# Altium PCB OFP_CIM_v1.5.PcbDoc (part 3 of 3)
Units mil, origin at the board's own origin, x right, y up, seen from the top; angles counter-clockwise.
Board outline 4311.02 x 2539.37 mil, 4 copper layers (Top Layer, Layer 1, Layer 2, Bottom Layer), stack 62.047 mil thick; 193 components, 140 nets, 567 pads, 380 vias.
Unrouted connection lines stored in the file: 1.
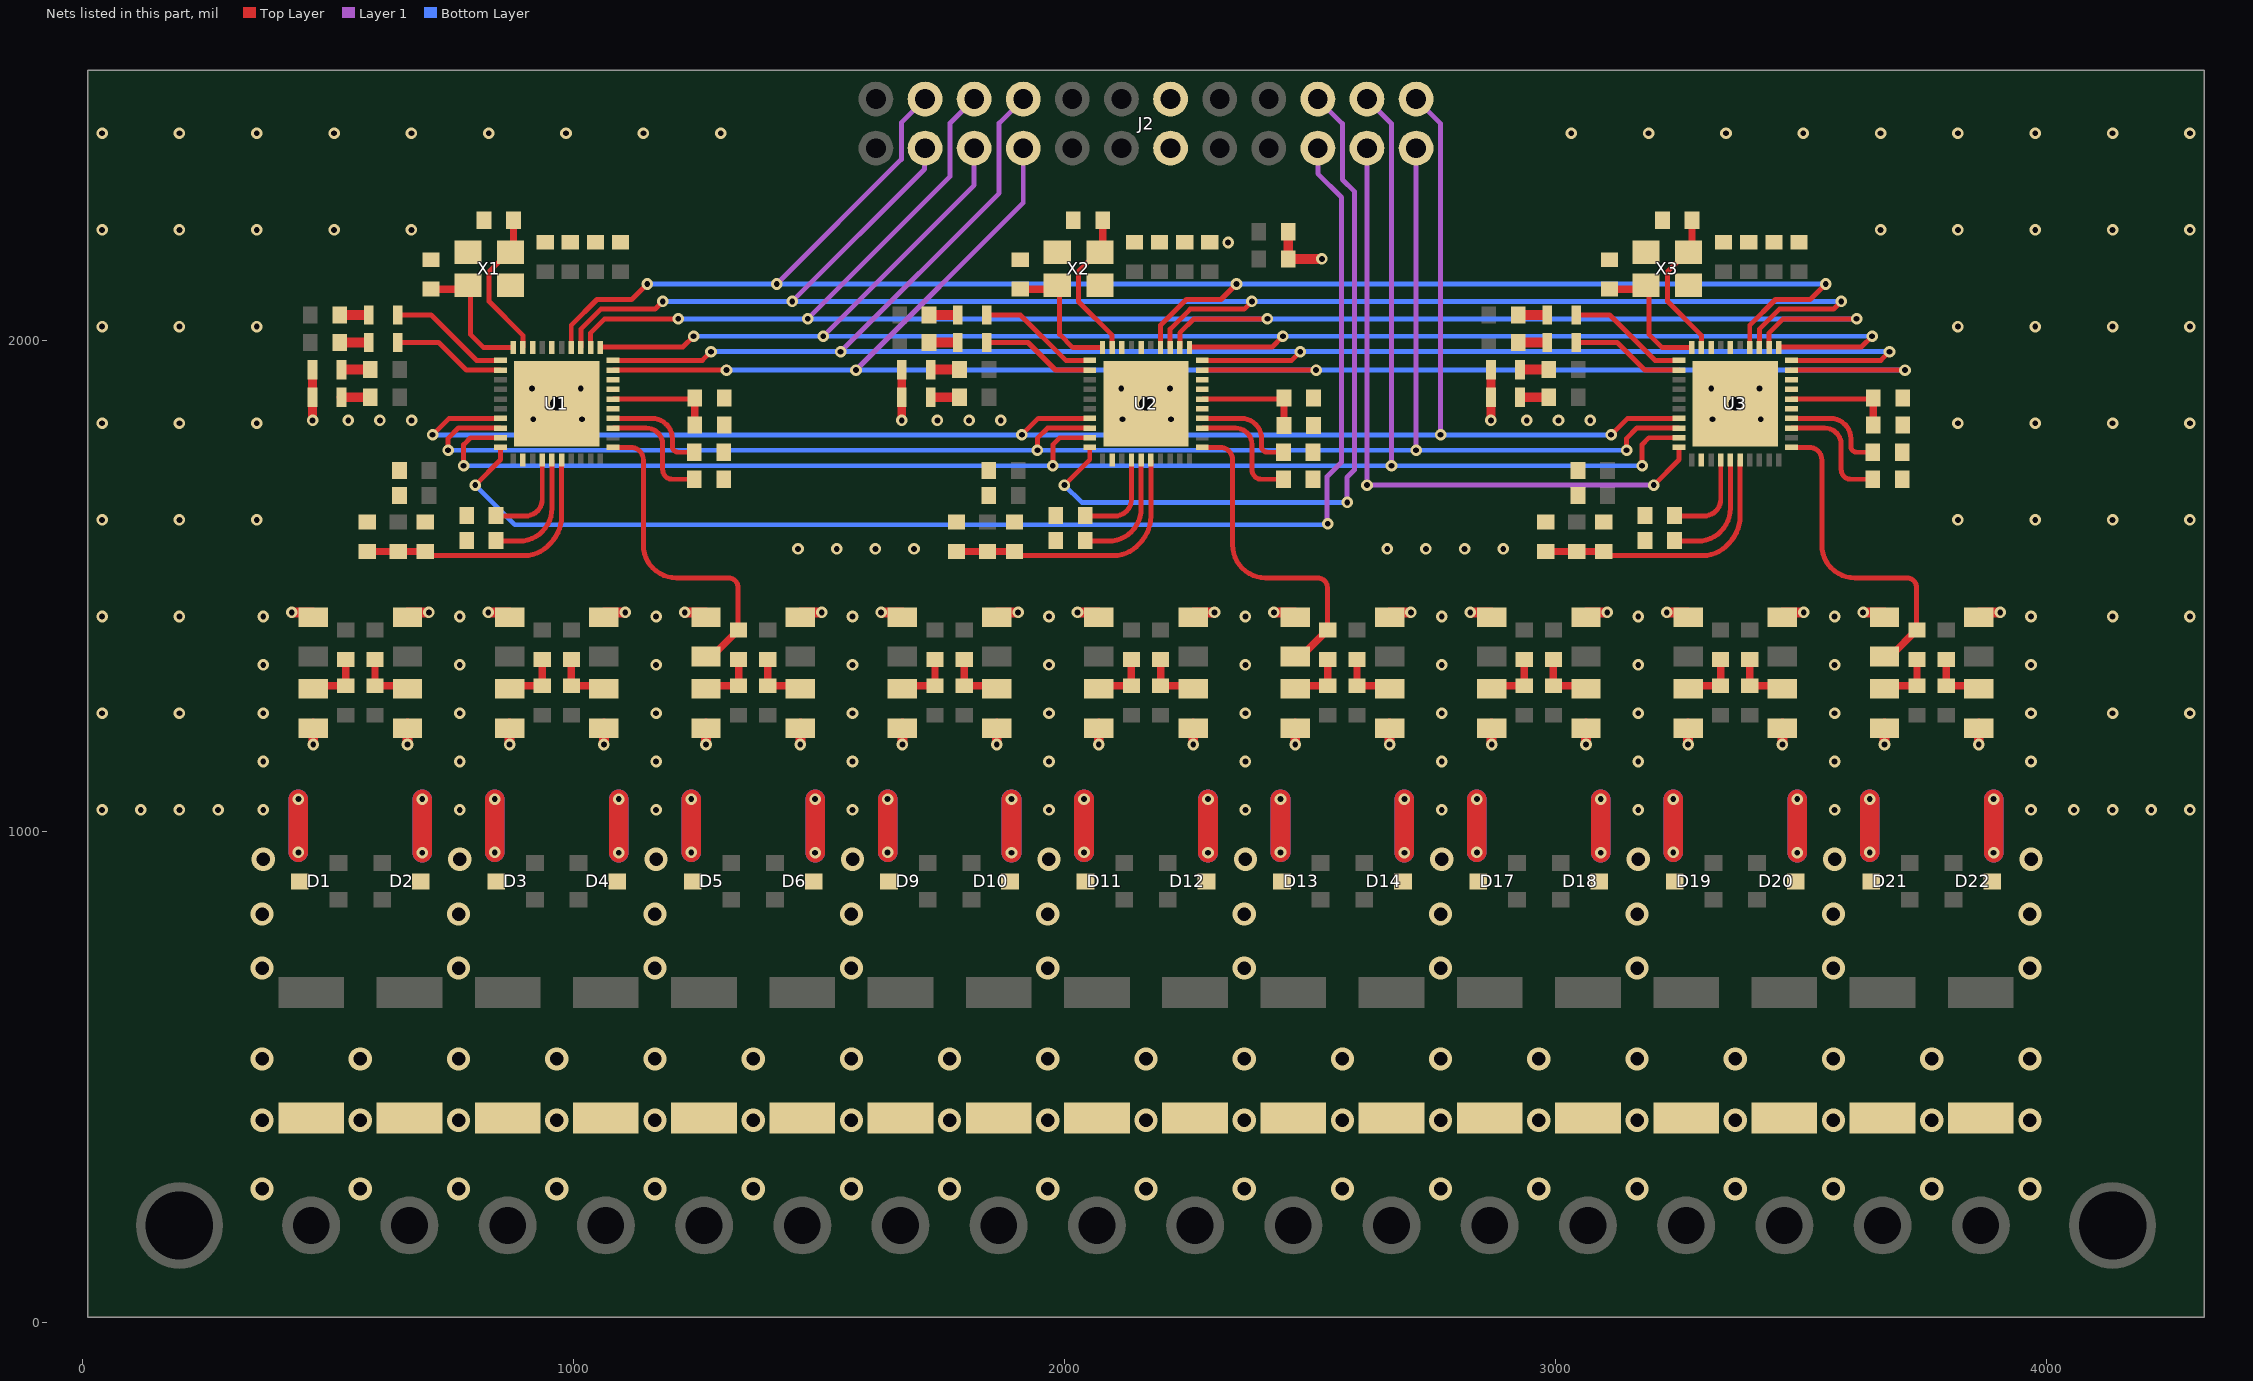
[diagram p4: the nets of this part, all layers, seen from the top]

## Via types
v1: diameter 23.62, hole 11.81, Top Layer to Bottom Layer, tented both sides, 272 vias
v2: diameter 47.24, hole 27.56, Top Layer to Bottom Layer, tented both sides, 108 vias

## Nets (pads, with @x,y where several pads share a name; then routed paths per layer and width w, separated by ;. In a path a pad name is that pad's centre, name@x,y a point inside that pad or via, vN(x,y) a via of type N, cw(c..) or ccw(c..) an arc to the next point about the centre after c; other vN are vias at no path point) (continued)
ICP1: C12.2 R16.2 U1.11 | length 678.2
  Top Layer w10: U1.11@1081.3,1781.5 1116.14,1781.5 cw(c1116.14,1755.91) 1141.73,1755.91 1141.73,1582.68 ccw(c1208.66,1582.68) 1208.66,1515.75 1314.96,1515.75 cw(c1314.96,1496.06) 1334.65,1496.06 R16.2@1334.65,1409.51 ; R16.2@1324.88,1402.64 R16.2@1335.63,1413.39
  Top Layer w15: C12.2@1269.29,1355.51 1291.79,1366.43 1327.2,1402.01 R16.2@1334.67,1409.51
ICP2: C39.2 R49.2 U2.11 | length 663
  Top Layer w10: U2.11@2281.3,1781.5 2316.14,1781.5 cw(c2316.14,1755.91) 2341.73,1755.91 2341.73,1582.68 ccw(c2408.66,1582.68) 2408.66,1515.75 2514.96,1515.75 cw(c2514.96,1496.06) 2534.65,1496.06 R49.2@2534.65,1409.51
  Top Layer w15: C39.2@2469.29,1355.51 2491.79,1366.43 2527.2,1402.01 R49.2@2534.67,1409.51
ICP3: C66.2 R82.2 U3.11 | length 663
  Top Layer w10: U3.11@3481.3,1781.5 3516.14,1781.5 cw(c3516.14,1755.91) 3541.73,1755.91 3541.73,1582.68 ccw(c3608.66,1582.68) 3608.66,1515.75 3714.96,1515.75 cw(c3714.96,1496.06) 3734.65,1496.06 R82.2@3734.65,1409.51
  Top Layer w15: C66.2@3669.29,1355.51 3691.79,1366.43 3727.2,1402.01 R82.2@3734.67,1409.51
IN_N1: 
IN_N2: 
IN_N3: 
IN_P1: 
IN_P2: 
IN_P3: 
INN1: R27.1 U1.14 | length 213.6
  Top Layer w10: U1.14@1081.3,1840.55 1159.45,1840.55 cw(c1159.45,1799.21) 1200.79,1799.21 1200.79,1783.47 ccw(c1212.6,1783.47) 1212.6,1771.65 R27.1@1245.38,1771.65 R27.1@1248.82,1771.65
INN2: R60.1 U2.14 | length 213.6
  Top Layer w10: U2.14@2281.3,1840.55 2359.45,1840.55 cw(c2359.45,1799.21) 2400.79,1799.21 2400.79,1783.47 ccw(c2412.6,1783.47) 2412.6,1771.65 R60.1@2445.38,1771.65 R60.1@2448.82,1771.65
INN3: R93.1 U3.14 | length 213.6
  Top Layer w10: U3.14@3481.3,1840.55 3559.45,1840.55 cw(c3559.45,1799.21) 3600.79,1799.21 3600.79,1783.47 ccw(c3612.6,1783.47) 3612.6,1771.65 R93.1@3645.38,1771.65 R93.1@3648.82,1771.65
INP1: R25.2 U1.13 | length 249
  Top Layer w10: U1.13@1081.3,1820.87 1147.64,1820.87 cw(c1147.64,1787.4) 1181.1,1787.4 1181.1,1736.22 ccw(c1200.79,1736.22) 1200.79,1716.54 R25.2@1248.82,1716.54
INP2: R58.2 U2.13 | length 249
  Top Layer w10: U2.13@2281.3,1820.87 2347.64,1820.87 cw(c2347.64,1787.4) 2381.1,1787.4 2381.1,1736.22 ccw(c2400.79,1736.22) 2400.79,1716.54 R58.2@2448.82,1716.54
INP3: R91.2 U3.13 | length 249
  Top Layer w10: U3.13@3481.3,1820.87 3547.64,1820.87 cw(c3547.64,1787.4) 3581.1,1787.4 3581.1,1736.22 ccw(c3600.79,1736.22) 3600.79,1716.54 R91.2@3648.82,1716.54
IRQ0_1: LED3.2 U1.31 | length 246.5
  Top Layer w10: LED3.2@641.24,2051.18 709.45,2051.18 801.97,1958.66 U1.31@849.41,1958.66
IRQ0_2: LED7.2 U2.31 | length 246.5
  Top Layer w10: LED7.2@1841.24,2051.18 1909.45,2051.18 2001.97,1958.66 U2.31@2049.41,1958.66
IRQ0_3: LED11.2 U3.31 | length 246.5
  Top Layer w10: LED11.2@3041.24,2051.18 3109.45,2051.18 3201.97,1958.66 U3.31@3249.41,1958.66
IRQ1_1: LED4.2 U1.32 | length 231.4
  Top Layer w10: LED4.2@641.24,1995 725.04,1995 781.06,1938.98 U1.32@849.41,1938.98
IRQ1_2: LED8.2 U2.32 | length 231.4
  Top Layer w10: LED8.2@1841.24,1995 1925.04,1995 1981.06,1938.98 U2.32@2049.41,1938.98
IRQ1_3: LED12.2 U3.32 | length 231.4
  Top Layer w10: LED12.2@3041.24,1995 3125.04,1995 3181.06,1938.98 U3.32@3249.41,1938.98
MISO: J2.2 U1.38 U2.38 U3.38 | length 3430.2
  Top Layer w10: v1(744.09,1775.59) 744.09,1799.85 765.11,1820.87 U1.38@849.41,1820.87 ; v1(1944.09,1775.59) 1944.09,1799.85 1965.11,1820.87 U2.38@2049.41,1820.87 ; v1(3144.09,1775.59) 3144.09,1799.85 3165.11,1820.87 U3.38@3249.41,1820.87
  Layer 1 w10: v1(2715.35,1775.59) J2.2@2715.35,2390.95
  Bottom Layer w10: v1(744.09,1775.59) v1(1944.09,1775.59) v1(2715.35,1775.59) v1(3144.09,1775.59)
MOSI: J2.3 U1.39 U2.39 U3.39 | length 3535.7
  Top Layer w10: v1(775.59,1744.1) 775.59,1787.2 789.57,1801.18 U1.39@849.41,1801.18 ; v1(1975.59,1744.1) 1975.59,1787.2 1989.57,1801.18 U2.39@2049.41,1801.18 ; v1(3175.59,1744.1) 3175.59,1787.2 3189.57,1801.18 U3.39@3249.41,1801.18
  Layer 1 w10: J2.3@2615.35,2490.95 2665.35,2440.95 v1(2665.35,1744.1)
  Bottom Layer w10: v1(775.59,1744.1) v1(1975.59,1744.1) v1(3175.59,1744.1)
NetC1_2: C1.2 R1.2 R2.1 | length 122.5
  Top Layer w15: C1.2@469.29,1289.84 475.29,1295.84 R1.2@535.63,1295.84 R2.1@535.63,1349.51
NetC3_1: C3.1 R5.2 R6.1 | length 114
  Top Layer w15: R6.1@595.08,1349.51 R5.2@595.08,1295.84 C3.1@655.42,1295.84
NetC5_2: C5.2 R9.2 R10.1 | length 122.5
  Top Layer w15: C5.2@869.29,1289.84 875.29,1295.84 R9.2@935.63,1295.84 R10.1@935.63,1349.51
NetC7_1: C7.1 R13.2 R14.1 | length 114
  Top Layer w15: R14.1@995.08,1349.51 R13.2@995.08,1295.84 C7.1@1055.42,1295.84
NetC9_2: C9.2 U1.30 X1.3 | length 279.2
  Top Layer w10: X1.3@775.91,2103.86 X1.3@783.86,2111.81 ; X1.3@784.65,2112.6 789.51,2107.73 789.51,2011.59 816.56,1984.55 U1.30@876.77,1984.55
  Top Layer w15: C9.2@709.45,2103.86 X1.3@775.91,2103.86
NetC10_2: C10.2 U1.29 X1.1 | length 309.4
  Top Layer w10: X1.1@870.47,2178.74 X1.1@877.36,2185.63 ; X1.1@870.59,2178.62 866.65,2178.62 827.68,2139.65 827.68,2078.62 896.46,2009.84 896.46,1986.02 U1.29@896.57,1985.91
  Top Layer w15: X1.1@877.36,2185.63 C10.2@877.36,2243.98
NetC11_2: C11.2 R15.2 R16.1 | length 122.5
  Top Layer w15: C11.2@1269.29,1289.84 1275.29,1295.84 R15.2@1335.63,1295.84 R16.1@1335.63,1349.51
NetC13_1: C13.1 R19.2 R20.1 | length 114
  Top Layer w15: R20.1@1395.08,1349.51 R19.2@1395.08,1295.84 C13.1@1455.42,1295.84
NetC16_2: 
NetC18_1: 
NetC28_2: C28.2 R34.2 R35.1 | length 122.5
  Top Layer w15: C28.2@1669.29,1289.84 1675.29,1295.84 R34.2@1735.63,1295.84 R35.1@1735.63,1349.51
NetC30_1: C30.1 R38.2 R39.1 | length 114
  Top Layer w15: R39.1@1795.08,1349.51 R38.2@1795.08,1295.84 C30.1@1855.42,1295.84
NetC32_2: C32.2 R42.2 R43.1 | length 122.5
  Top Layer w15: C32.2@2069.29,1289.84 2075.29,1295.84 R42.2@2135.63,1295.84 R43.1@2135.63,1349.51
NetC34_1: C34.1 R46.2 R47.1 | length 114
  Top Layer w15: R47.1@2195.08,1349.51 R46.2@2195.08,1295.84 C34.1@2255.42,1295.84
NetC36_2: C36.2 U2.30 X2.3 | length 279.2
  Top Layer w10: X2.3@1975.91,2103.86 X2.3@1983.86,2111.81 ; X2.3@1984.65,2112.6 1989.51,2107.73 1989.51,2011.59 2016.56,1984.55 U2.30@2076.77,1984.55
  Top Layer w15: C36.2@1909.45,2103.86 X2.3@1975.91,2103.86
NetC37_2: C37.2 U2.29 X2.1 | length 309.4
  Top Layer w10: X2.1@2070.47,2178.74 X2.1@2077.36,2185.63 ; X2.1@2070.59,2178.62 2066.65,2178.62 2027.68,2139.65 2027.68,2078.62 2096.46,2009.84 2096.46,1986.02 U2.29@2096.57,1985.91
  Top Layer w15: X2.1@2077.36,2185.63 C37.2@2077.36,2243.98
NetC38_2: C38.2 R48.2 R49.1 | length 122.5
  Top Layer w15: C38.2@2469.29,1289.84 2475.29,1295.84 R48.2@2535.63,1295.84 R49.1@2535.63,1349.51
NetC40_1: C40.1 R52.2 R53.1 | length 114
  Top Layer w15: R53.1@2595.08,1349.51 R52.2@2595.08,1295.84 C40.1@2655.42,1295.84
NetC43_2: 
NetC45_1: 
NetC55_2: C55.2 R67.2 R68.1 | length 122.5
  Top Layer w15: C55.2@2869.29,1289.84 2875.29,1295.84 R67.2@2935.63,1295.84 R68.1@2935.63,1349.51
NetC57_1: C57.1 R71.2 R72.1 | length 114
  Top Layer w15: R72.1@2995.08,1349.51 R71.2@2995.08,1295.84 C57.1@3055.42,1295.84
NetC59_2: C59.2 R75.2 R76.1 | length 122.5
  Top Layer w15: C59.2@3269.29,1289.84 3275.29,1295.84 R75.2@3335.63,1295.84 R76.1@3335.63,1349.51
NetC61_1: C61.1 R79.2 R80.1 | length 114
  Top Layer w15: R80.1@3395.08,1349.51 R79.2@3395.08,1295.84 C61.1@3455.42,1295.84
NetC63_2: C63.2 U3.30 X3.3 | length 279.2
  Top Layer w10: X3.3@3175.91,2103.86 X3.3@3183.86,2111.81 ; X3.3@3184.65,2112.6 3189.51,2107.73 3189.51,2011.59 3216.56,1984.55 U3.30@3276.77,1984.55
  Top Layer w15: C63.2@3109.45,2103.86 X3.3@3175.91,2103.86
NetC64_2: C64.2 U3.29 X3.1 | length 309.4
  Top Layer w10: X3.1@3270.47,2178.74 X3.1@3277.36,2185.63 ; X3.1@3270.59,2178.62 3266.65,2178.62 3227.68,2139.65 3227.68,2078.62 3296.46,2009.84 3296.46,1986.02 U3.29@3296.57,1985.91
  Top Layer w15: X3.1@3277.36,2185.63 C64.2@3277.36,2243.98
NetC65_2: C65.2 R81.2 R82.1 | length 122.5
  Top Layer w15: C65.2@3669.29,1289.84 3675.29,1295.84 R81.2@3735.63,1295.84 R82.1@3735.63,1349.51
NetC67_1: C67.1 R85.2 R86.1 | length 114
  Top Layer w15: R86.1@3795.08,1349.51 R85.2@3795.08,1295.84 C67.1@3855.42,1295.84
NetC70_2: 
NetC72_1: 
NetD7_1: 
NetD8_1: 
NetD15_1: 
NetD16_1: 
NetD23_1: 
NetD24_1: 
NetLED1_1: LED1.1 R30.1 | length 53.5
  Top Layer w20: LED1.1@528.72,1939.88 R30.1@582.24,1939.88
NetLED2_1: LED2.1 R31.1 | length 58.6
  Top Layer w20: LED2.1@527.13,1883.7 R31.1@585.71,1883.7
NetLED3_1: LED3.1 R32.1 | length 56.7
  Top Layer w20: R32.1@523.6,2051.18 LED3.1@580.32,2051.18
NetLED4_1: LED4.1 R33.1 | length 56.4
  Top Layer w20: R33.1@523.6,1995 LED4.1@580.04,1995
NetLED5_1: LED5.1 R63.1 | length 53.5
  Top Layer w20: LED5.1@1728.72,1939.88 R63.1@1782.24,1939.88
NetLED6_1: LED6.1 R64.1 | length 58.6
  Top Layer w20: LED6.1@1727.13,1883.7 R64.1@1785.71,1883.7
NetLED7_1: LED7.1 R65.1 | length 56.7
  Top Layer w20: R65.1@1723.6,2051.18 LED7.1@1780.32,2051.18
NetLED8_1: LED8.1 R66.1 | length 56.4
  Top Layer w20: R66.1@1723.6,1995 LED8.1@1780.04,1995
NetLED9_1: LED9.1 R96.1 | length 53.5
  Top Layer w20: LED9.1@2928.72,1939.88 R96.1@2982.24,1939.88
NetLED10_1: LED10.1 R97.1 | length 58.6
  Top Layer w20: LED10.1@2927.13,1883.7 R97.1@2985.71,1883.7
NetLED11_1: LED11.1 R98.1 | length 56.7
  Top Layer w20: R98.1@2923.6,2051.18 LED11.1@2980.32,2051.18
NetLED12_1: LED12.1 R99.1 | length 56.4
  Top Layer w20: R99.1@2923.6,1995 LED12.1@2980.04,1995
NetR7_2: R7.2 U1.4 | length 194.2
  Top Layer w10: R7.2@839.37,1641.73 901.57,1641.73 ccw(c901.57,1675.98) 935.83,1675.98 U1.4@935.83,1754.13
NetR8_2: R8.2 U1.5 | length 251
  Top Layer w10: R8.2@839.37,1590.55 888.62,1590.55 ccw(c888.62,1657.44) 955.51,1657.44 U1.5@955.51,1754.13
NetR40_2: R40.2 U2.4 | length 194.2
  Top Layer w10: R40.2@2039.37,1641.73 2101.57,1641.73 ccw(c2101.57,1675.98) 2135.83,1675.98 U2.4@2135.83,1754.13
NetR41_2: R41.2 U2.5 | length 251
  Top Layer w10: R41.2@2039.37,1590.55 2088.62,1590.55 ccw(c2088.62,1657.44) 2155.51,1657.44 U2.5@2155.51,1754.13
NetR73_2: R73.2 U3.4 | length 194.2
  Top Layer w10: R73.2@3239.37,1641.73 3301.57,1641.73 ccw(c3301.57,1675.98) 3335.83,1675.98 U3.4@3335.83,1754.13
NetR74_2: R74.2 U3.5 | length 251
  Top Layer w10: R74.2@3239.37,1590.55 3288.62,1590.55 ccw(c3288.62,1657.44) 3355.51,1657.44 U3.5@3355.51,1754.13
NGND: C1.1 C2.1 C3.2 C4.2 C5.1 C6.1 C7.2 C8.2 C9.1 C10.1 C11.1 C12.1 C13.2 C14.2 C15.1 C20.1 C21.1 C22.1 C23.1 C24.1 C25.1 C26.1 C27.1 C28.1 C29.1 C30.2 C31.2 C32.1 C33.1 C34.2 C35.2 C36.1 C37.1 C38.1 C39.1 C40.2 C41.2 C42.1 C47.1 C48.1 C49.1 C50.1 C51.1 C52.1 C53.1 C54.1 C55.1 C56.1 C57.2 C58.2 C59.1 C60.1 C61.2 C62.2 C63.1 C64.1 C65.1 C66.1 C67.2 C68.2 C69.1 C74.1 C75.1 C76.1 C77.1 C78.1 C79.1 C80.1 C81.1 C82.1 C83.1 D1.3 D2.3 D3.3 D4.3 D5.3 D6.3 D9.3 D10.3 D11.3 D12.3 D13.3 D14.3 D17.3 D18.3 D19.3 D20.3 D21.3 D22.3 J2.11 J2.12 LED1.2 LED2.2 LED5.2 LED6.2 LED9.2 LED10.2 R3.1 R4.2 R7.1 R8.1 R11.1 R12.2 R17.1 R18.2 R25.1 R27.2 R36.1 R37.2 R40.1 R41.1 R44.1 R45.2 R50.1 R51.2 R58.1 R60.2 R69.1 R70.2 R73.1 R74.1 R77.1 R78.2 R83.1 R84.2 R91.1 R93.2 SB1.1 SB2.1 SB3.1 U1.2 U1.15 U1.17 U1.18 U1.26 U1.28 U1.41 U2.2 U2.15 U2.17 U2.18 U2.26 U2.28 U2.41 U3.2 U3.15 U3.17 U3.18 U3.26 U3.28 U3.41 X1.2 X1.4 X2.2 X2.4 X3.2 X3.4 | length 5880.7
  Top Layer w18: LED2.2@467.82,1883.7 467.82,1924.03 467.91,1924.12 LED1.2@467.91,1930.2 ; v1@468.07,1836.7 LED2.2@468.07,1883.7 ; LED6.2@1667.82,1883.7 1667.82,1924.03 1667.91,1924.12 LED5.2@1667.91,1930.2 ; v1@1668.07,1836.7 LED6.2@1668.07,1883.7 ; LED10.2@2867.82,1883.7 2867.82,1924.03 2867.91,1924.12 LED9.2@2867.91,1930.2 ; v1@2868.07,1836.7 LED10.2@2868.07,1883.7
  Top Layer w20: v1(425.83,1445.51) C2.1@469.29,1445.51 ; v1(469.29,1176.38) C1.1@469.29,1219.84 ; v1(661.42,1176.38) C3.2@661.42,1219.84 ; C4.2@661.42,1445.51 v1(704.88,1445.51) ; v1(825.83,1445.51) C6.1@869.29,1445.51 ; v1(869.29,1176.38) C5.1@869.29,1219.84 ; v1(1061.42,1176.38) C7.2@1061.42,1219.84 ; C8.2@1061.42,1445.51 v1(1104.88,1445.51) ; v1(1225.83,1445.51) C12.1@1269.29,1445.51 ; v1(1269.29,1176.38) C11.1@1269.29,1219.84 ; v1(1461.42,1176.38) C13.2@1461.42,1219.84 ; C14.2@1461.42,1445.51 v1(1504.88,1445.51) ; v1(1625.83,1445.51) C29.1@1669.29,1445.51 ; v1(1669.29,1176.38) C28.1@1669.29,1219.84 ; v1(1861.42,1176.38) C30.2@1861.42,1219.84 ; C31.2@1861.42,1445.51 v1(1904.88,1445.51) ; v1(2025.83,1445.51) C33.1@2069.29,1445.51 ; v1(2069.29,1176.38) C32.1@2069.29,1219.84 ; v1(2261.42,1176.38) C34.2@2261.42,1219.84 ; C35.2@2261.42,1445.51 v1(2304.88,1445.51) ; v1(2425.83,1445.51) C39.1@2469.29,1445.51 ; C83.1@2455.2,2220.47 C82.1@2455.2,2165.35 v1(2523.62,2165.35) ; v1(2469.29,1176.38) C38.1@2469.29,1219.84 ; v1(2661.42,1176.38) C40.2@2661.42,1219.84 ; C41.2@2661.42,1445.51 v1(2704.88,1445.51) ; v1(2825.83,1445.51) C56.1@2869.29,1445.51 ; v1(2869.29,1176.38) C55.1@2869.29,1219.84 ; v1(3061.42,1176.38) C57.2@3061.42,1219.84 ; C58.2@3061.42,1445.51 v1(3104.88,1445.51) ; v1(3225.83,1445.51) C60.1@3269.29,1445.51 ; v1(3269.29,1176.38) C59.1@3269.29,1219.84 ; v1(3461.42,1176.38) C61.2@3461.42,1219.84 ; C62.2@3461.42,1445.51 v1(3504.88,1445.51) ; v1(3625.83,1445.51) C66.1@3669.29,1445.51 ; v1(3669.29,1176.38) C65.1@3669.29,1219.84 ; v1(3861.42,1176.38) C67.2@3861.42,1219.84 ; C68.2@3861.42,1445.51 v1(3904.88,1445.51)
  Top Layer w40: v1(439.17,956.69) v1(439.17,1065.16) ; v1(691.54,955.91) v1@691.54,1064.37 ; v1(839.17,956.69) v1(839.17,1065.16) ; v1(1091.54,955.91) v1@1091.54,1064.37 ; v1(1239.17,956.69) v1(1239.17,1065.16) ; v1(1491.54,955.91) v1@1491.54,1064.37 ; v1(1639.17,956.69) v1(1639.17,1065.16) ; v1(1891.54,955.91) v1@1891.54,1064.37 ; v1(2039.17,956.69) v1(2039.17,1065.16) ; v1(2291.54,955.91) v1@2291.54,1064.37 ; v1(2439.17,956.69) v1(2439.17,1065.16) ; v1(2691.54,955.91) v1@2691.54,1064.37 ; v1(2839.17,956.69) v1(2839.17,1065.16) ; v1(3091.54,955.91) v1@3091.54,1064.37 ; v1(3239.17,956.69) v1(3239.17,1065.16) ; v1(3491.54,955.91) v1@3491.54,1064.37 ; v1(3639.17,956.69) v1(3639.17,1065.16) ; v1(3891.54,955.91) v1@3891.54,1064.37
  Bottom Layer w40: v1(439.17,956.69) v1(439.17,1065.16) ; v1(691.54,955.91) v1(691.54,1065.16) ; v1(839.17,956.69) v1(839.17,1065.16) ; v1(1091.54,955.91) v1(1091.54,1065.16) ; v1(1239.17,956.69) v1(1239.17,1065.16) ; v1(1491.54,955.91) v1(1491.54,1065.16) ; v1(1639.17,956.69) v1(1639.17,1065.16) ; v1(1891.54,955.91) v1(1891.54,1065.16) ; v1(2039.17,956.69) v1(2039.17,1065.16) ; v1(2291.54,955.91) v1(2291.54,1065.16) ; v1(2439.17,956.69) v1(2439.17,1065.16) ; v1(2691.54,955.91) v1(2691.54,1065.16) ; v1(2839.17,956.69) v1(2839.17,1065.16) ; v1(3091.54,955.91) v1(3091.54,1065.16) ; v1(3239.17,956.69) v1(3239.17,1065.16) ; v1(3491.54,955.91) v1(3491.54,1065.16) ; v1(3639.17,956.69) v1(3639.17,1065.16) ; v1(3891.54,955.91) v1(3891.54,1065.16)
  other v1: 39.37,1043.31 118.11,1043.31 196.85,1043.31 275.59,1043.31 367.72,1043.31 767.72,1043.31 1167.72,1043.31 1567.72,1043.31 1967.72,1043.31 2367.72,1043.31 2767.72,1043.31 3167.72,1043.31 3567.72,1043.31 3967.72,1043.31 4055.12,1043.31 4133.86,1043.31 4212.6,1043.31 4291.34,1043.31 367.72,1141.73 767.72,1141.73 1167.72,1141.73 1567.72,1141.73 1967.72,1141.73 2367.72,1141.73 2767.72,1141.73 3167.72,1141.73 3567.72,1141.73 3967.72,1141.73 39.37,1240.16 196.85,1240.16 367.72,1240.16 767.72,1240.16 1167.72,1240.16 1567.72,1240.16 1967.72,1240.16 2367.72,1240.16 2767.72,1240.16 3167.72,1240.16 3567.72,1240.16 3967.72,1240.16 4133.86,1240.16 4291.34,1240.16 367.72,1338.58 767.72,1338.58 1167.72,1338.58 1567.72,1338.58 1967.72,1338.58 2367.72,1338.58 2767.72,1338.58 3167.72,1338.58 3567.72,1338.58 3967.72,1338.58 39.37,1437.01 196.85,1437.01 367.72,1437.01 767.72,1437.01 1167.72,1437.01 1567.72,1437.01 1967.72,1437.01 2367.72,1437.01 2767.72,1437.01 3167.72,1437.01 3567.72,1437.01 3967.72,1437.01 4133.86,1437.01 4291.34,1437.01 1456.69,1574.8 1535.43,1574.8 1614.17,1574.8 1692.91,1574.8 2656.69,1574.8 2735.43,1574.8 2814.17,1574.8 2892.91,1574.8 39.37,1633.86 196.85,1633.86 354.33,1633.86 3818.9,1633.86 3976.38,1633.86 4133.86,1633.86 4291.34,1633.86 39.37,1830.71 196.85,1830.71 354.33,1830.71 3818.9,1830.71 3976.38,1830.71 4133.86,1830.71 4291.34,1830.71 468.07,1836.46 540.55,1836.46 605.12,1836.46 669.69,1836.46 1668.07,1836.46 1740.55,1836.46 1805.12,1836.46 1869.69,1836.46 2867.82,1836.46 2940.95,1836.46 3005.51,1836.46 3070.08,1836.46 917.32,1838.58 1016.54,1838.58 2117.32,1838.58 2216.54,1838.58 3318.9,1838.58 3417.32,1838.58 914.96,1901.58 1014.17,1901.58 2114.96,1901.58 2214.17,1901.58 3316.54,1901.58 3414.96,1901.58 39.37,2027.56 196.85,2027.56 354.33,2027.56 3818.9,2027.56 3976.38,2027.56 4133.86,2027.56 4291.34,2027.56 2332.63,2198.77 39.37,2224.41 196.85,2224.41 354.33,2224.41 511.81,2224.41 669.29,2224.41 3661.42,2224.41 3818.9,2224.41 3976.38,2224.41 4133.86,2224.41 4291.34,2224.41 39.37,2421.26 196.85,2421.26 354.33,2421.26 511.81,2421.26 669.29,2421.26 826.77,2421.26 984.25,2421.26 1141.73,2421.26 1299.21,2421.26 3031.5,2421.26 3188.98,2421.26 3346.46,2421.26 3503.94,2421.26 3661.42,2421.26 3818.9,2421.26 3976.38,2421.26 4133.86,2421.26 4291.34,2421.26
  other v2: 365.35,271.26 565.35,271.26 765.35,271.26 965.35,271.26 1165.35,271.26 1365.35,271.26 1565.35,271.26 1765.35,271.26 1965.35,271.26 2165.35,271.26 2365.35,271.26 2565.35,271.26 2765.35,271.26 2965.35,271.26 3165.35,271.26 3365.35,271.26 3565.35,271.26 3765.35,271.26 3965.35,271.26 365.35,411.22 565.35,411.22 765.35,411.22 965.35,411.22 1165.35,411.22 1365.35,411.22 1565.35,411.22 1765.35,411.22 1965.35,411.22 2165.35,411.22 2365.35,411.22 2565.35,411.22 2765.35,411.22 2965.35,411.22 3165.35,411.22 3365.35,411.22 3565.35,411.22 3765.35,411.22 3965.35,411.22 365.35,536.18 565.35,536.18 765.35,536.18 965.35,536.18 1165.35,536.18 1365.35,536.18 1565.35,536.18 1765.35,536.18 1965.35,536.18 2165.35,536.18 2365.35,536.18 2565.35,536.18 2765.35,536.18 2965.35,536.18 3165.35,536.18 3365.35,536.18 3565.35,536.18 3765.35,536.18 3965.35,536.18 365.35,721.14 765.35,721.14 1165.35,721.14 1565.35,721.14 1965.35,721.14 2365.35,721.14 2765.35,721.14 3165.35,721.14 3565.35,721.14 3965.35,721.14 365.35,831.1 765.35,831.1 1165.35,831.1 1565.35,831.1 1965.35,831.1 2365.35,831.1 2765.35,831.1 3165.35,831.1 3565.35,831.1 3965.35,831.1 367.72,942.83 767.72,942.83 1167.72,942.83 1567.72,942.83 1967.72,942.83 2367.72,942.83 2767.72,942.83 3167.72,942.83 3567.72,942.83 3967.72,942.83 965.35,1870.08 2165.35,1870.08 3365.35,1870.08
REF1: C24.2 C25.2 U1.16 | length 221.3
  Top Layer w10: U1.16@1081.3,1879.92 1244.41,1879.92 ccw(c1244.41,1881.89) C25.2@1246.38,1881.89
  Top Layer w15: C24.2@1246.38,1826.77 C25.2@1246.38,1881.89
REF2: C51.2 C52.2 U2.16 | length 221.3
  Top Layer w10: U2.16@2281.3,1879.92 2444.41,1879.92 ccw(c2444.41,1881.89) C52.2@2446.38,1881.89
  Top Layer w15: C51.2@2446.38,1826.77 C52.2@2446.38,1881.89
REF3: C78.2 C79.2 U3.16 | length 221.3
  Top Layer w10: U3.16@3481.3,1879.92 3644.41,1879.92 ccw(c3644.41,1881.89) C79.2@3646.38,1881.89
  Top Layer w15: C78.2@3646.38,1826.77 C79.2@3646.38,1881.89
RESET1: C15.2 R21.2 SB1.2 U1.6 | length 554.5
  Top Layer w10: C15.2@697.64,1569.55 706.12,1561.07 899.17,1561.07 ccw(c899.17,1629.96) 952.45,1586.29 ccw(c897.55,1641.19) 975.2,1641.19 U1.6@975.2,1754.13
  Top Layer w15: SB1.2@583.03,1569.55 R21.2@642.52,1569.55 C15.2@697.64,1569.55
RESET2: C42.2 R54.2 SB2.2 U2.6 | length 554.5
  Top Layer w10: C42.2@1897.64,1569.55 1906.12,1561.07 2099.17,1561.07 ccw(c2099.17,1629.96) 2152.45,1586.29 ccw(c2097.55,1641.19) 2175.2,1641.19 U2.6@2175.2,1754.13
  Top Layer w15: SB2.2@1783.03,1569.55 R54.2@1842.52,1569.55 C42.2@1897.64,1569.55
RESET3: C69.2 R87.2 SB3.2 U3.6 | length 554.5
  Top Layer w10: C69.2@3097.64,1569.55 3106.12,1561.07 3299.17,1561.07 ccw(c3299.17,1629.96) 3352.45,1586.29 ccw(c3297.55,1641.19) 3375.2,1641.19 U3.6@3375.2,1754.13
  Top Layer w15: SB3.2@2983.03,1569.55 R87.2@3042.52,1569.55 C69.2@3097.64,1569.55
SCLK: J2.1 U1.37 U2.37 U3.37 | length 3556.6
  Top Layer w10: v1(712.6,1807.09) 746.06,1840.55 U1.37@849.41,1840.55 ; v1(1912.6,1807.09) 1946.06,1840.55 U2.37@2049.41,1840.55 ; v1(3112.6,1807.09) 3146.06,1840.55 U3.37@3249.41,1840.55
  Layer 1 w10: J2.1@2715.35,2490.95 2765.35,2440.95 v1(2765.35,1807.09)
  Bottom Layer w10: v1(712.6,1807.09) v1(1912.6,1807.09) 2803.15,1807.09 v1(3112.6,1807.09)
SS1: J2.6 U1.40 | length 2666.3
  Top Layer w10: v1(799.21,1704.72) 850.88,1756.4 U1.40@850.88,1781.5
  Layer 1 w10: J2.6@2515.35,2390.95 2515.35,2338.8 2563.49,2290.66 2563.49,1751.51 2534.25,1722.27 2534.25,1627.17 v1(2535.43,1625.98)
  Bottom Layer w10: v1(799.21,1704.72) 880.08,1623.86 2533.31,1623.86 v1(2535.43,1625.98)
SS2: J2.5 U2.40 | length 1547.3
  Top Layer w10: v1(1999.21,1704.72) 2050.88,1756.4 U2.40@2050.88,1781.5
  Layer 1 w10: J2.5@2515.35,2490.95 2565.35,2440.95 2565.35,2327.07 2589.69,2302.73 2589.69,1735.36 2574.8,1720.47 2574.8,1669.76 v1(2575.12,1669.45)
  Bottom Layer w10: v1(1999.21,1704.72) 2034.49,1669.45 v1(2575.12,1669.45)
SS3: J2.4 U3.40 | length 1360.4
  Top Layer w10: v1(3199.21,1704.72) 3250.88,1756.4 U3.40@3250.88,1781.5
  Layer 1 w10: v1(2615.35,1704.72) v1(3199.21,1704.72) ; v1@2615.35,1712.6 J2.4@2615.35,2390.95
VA_N: J2.18 U1.19 U2.19 U3.19 | length 3690.4
  Top Layer w10: U1.19@1081.3,1938.98 1305.12,1938.98 ccw(c1305.12,1944.88) v1@1311.02,1944.88 ; U2.19@2281.3,1938.98 2505.12,1938.98 ccw(c2505.12,1944.88) v1@2511.02,1944.88 ; U3.19@3479.82,1938.98 v1(3711.02,1938.98)
  Layer 1 w10: v1(1574.8,1938.98) 1915.35,2279.53 J2.18@1915.35,2390.95
  Bottom Layer w10: v1(1311.02,1938.98) v1(1574.8,1938.98) v1(3711.02,1938.98)
  other v1: 2511.74,1938.98
VA_P: J2.17 U1.20 U2.20 U3.20 | length 3685.4
  Top Layer w10: U1.20@1081.3,1958.66 1261.81,1958.66 v1(1279.53,1976.38) ; U2.20@2281.3,1958.66 2461.81,1958.66 v1(2479.53,1976.38) ; U3.20@3481.3,1958.66 3661.81,1958.66 v1(3679.53,1976.38)
  Layer 1 w10: v1(1543.31,1976.38) 1866.14,2299.21 1866.14,2441.73 J2.17@1915.35,2490.95
  Bottom Layer w10: v1(1279.53,1976.38) v1(1543.31,1976.38) v1(2479.53,1976.38) v1(3679.53,1976.38)
VB_N: J2.20 U1.21 U2.21 U3.21 | length 3508.1
  Top Layer w10: U1.21@1053.94,1986.02 1222.24,1986.02 v1(1244.09,2007.87) ; U2.21@2253.94,1986.02 2422.24,1986.02 v1(2444.09,2007.87) ; U3.21@3453.94,1986.02 3622.24,1986.02 v1(3644.09,2007.87)
  Layer 1 w10: v1(1507.87,2007.87) 1815.35,2315.35 J2.20@1815.35,2390.95
  Bottom Layer w10: v1(1244.09,2007.87) v1(1507.87,2007.87) v1(2444.09,2007.87) v1(3644.09,2007.87)
VB_P: J2.19 U1.22 U2.22 U3.22 | length 3644.4
  Top Layer w10: U1.22@1034.25,1986.02 1034.25,2014.57 1062.99,2043.31 v1(1212.6,2043.31) ; U2.22@2234.25,1986.02 2234.25,2014.57 2262.99,2043.31 v1(2412.6,2043.31) ; U3.22@3434.25,1986.02 3434.25,2014.57 3462.99,2043.31 v1(3612.6,2043.31)
  Layer 1 w10: v1(1476.38,2043.31) 1766.55,2333.48 1766.55,2442.14 J2.19@1815.35,2490.95
  Bottom Layer w10: v1(1212.6,2043.31) v1(1476.38,2043.31) v1(2412.6,2043.31) v1(3612.6,2043.31)
VC_N: J2.22 U1.23 U2.23 U3.23 | length 3503.1
  Top Layer w10: U1.23@1014.57,1986.02 1014.57,2022.44 1055.12,2062.99 1165.35,2062.99 v1(1181.1,2078.74) ; U2.23@2214.57,1986.02 2214.57,2022.44 2255.12,2062.99 2365.35,2062.99 v1(2381.1,2078.74) ; U3.23@3414.57,1986.02 3414.57,2022.44 3455.12,2062.99 3565.35,2062.99 v1(3581.1,2078.74)
  Layer 1 w10: v1(1444.88,2078.74) 1714.48,2348.34 1714.48,2390.07 J2.22@1715.35,2390.95
  Bottom Layer w10: v1(1181.1,2078.74) v1(1444.88,2078.74) v1(2381.1,2078.74) v1(3581.1,2078.74)
VC_P: J2.21 U1.24 U2.24 U3.24 | length 3603.1
  Top Layer w10: U1.24@994.88,1986.02 994.88,2030.32 1047.24,2082.68 1118.11,2082.68 v1(1149.61,2114.17) ; U2.24@2194.88,1986.02 2194.88,2030.32 2247.24,2082.68 2318.11,2082.68 v1(2349.61,2114.17) ; U3.24@3394.88,1986.02 3394.88,2030.32 3447.24,2082.68 3518.11,2082.68 v1(3549.61,2114.17)
  Layer 1 w10: v1(1413.39,2114.17) 1667.19,2367.97 1667.19,2442.78 J2.21@1715.35,2490.95
  Bottom Layer w10: v1(1149.61,2114.17) v1(1413.39,2114.17) v1(2349.61,2114.17) v1(3549.61,2114.17)
pads on no net: J2.7 J2.8 J2.13 J2.14 J2.15 J2.16 J2.23 J2.24 U1.33 U1.34 U2.33 U2.34 U3.33 U3.34

## Polygon pours and split planes (outlines as drawn)
NGND on Layer 1 "NGND_L02_P001" (solid, remove dead copper, pour order 1): 10.2,1023.62 10.2,2548.86 4320.51,2548.86 4320.51,1023.62
NGND on Layer 1 "NGND_L02_P000" (solid, remove dead copper, pour order 0): 10.2,10.2 4320.51,10.2 4320.51,976.38 10.2,976.38
NGND on Layer 2 "NGND_L03_P002" (solid, remove dead copper, pour order 2): 10.2,10.2 4320.51,10.2 4320.51,976.38 10.2,976.38
NGND on Layer 2 "NGND_L03_P003" (solid, remove dead copper, pour order 3): 10.2,1023.62 10.2,2548.86 4320.51,2548.86 4320.51,1023.62
NGND on Bottom Layer "NGND_L04_P004" (solid, remove dead copper, pour order 4): 10.2,10.2 4320.51,10.2 4320.51,976.38 10.2,976.38
NGND on Bottom Layer "NGND_L04_P005" (solid, pour order 5): 10.2,1023.62 10.2,2548.86 4320.51,2548.86 4320.51,1023.62
IA_N1 on Top Layer "IA_N1_L01_P044" (solid, remove dead copper, pour order 44): 578.95,957.32 578.95,591.67 ccw(c610.83,591.67) 610.83,559.79 701.73,559.79 ccw(c701.73,590.35) 732.28,590.35 732.28,759.05 ccw(c691.54,758.64) 691.95,799.38 653.1,799.38 cw(c653.09,821.76) 630.71,821.77 630.71,957.32
IA_P1 on Top Layer "IA_P1_L01_P043" (solid, remove dead copper, pour order 43): 551.76,957.53 551.76,591.88 cw(c519.88,591.88) 519.88,560 428.98,560 cw(c428.98,590.55) 398.43,590.55 398.43,759.25 cw(c439.16,758.85) 438.76,799.59 477.61,799.59 ccw(c477.62,821.97) 500,821.98 500,957.53
IB_N1 on Top Layer "IB_N1_L01_P042" (solid, remove dead copper, pour order 42): 978.95,957.32 978.95,591.67 ccw(c1010.83,591.67) 1010.83,559.79 1101.73,559.79 ccw(c1101.73,590.35) 1132.28,590.35 1132.28,759.05 ccw(c1091.54,758.64) 1091.95,799.38 1053.1,799.38 cw(c1053.09,821.76) 1030.71,821.77 1030.71,957.32
IB_P1 on Top Layer "IB_P1_L01_P041" (solid, remove dead copper, pour order 41): 951.76,957.53 951.76,591.88 cw(c919.88,591.88) 919.88,560 828.98,560 cw(c828.98,590.55) 798.43,590.55 798.43,759.25 cw(c839.16,758.85) 838.76,799.59 877.61,799.59 ccw(c877.62,821.97) 900,821.98 900,957.53
IC_N1 on Top Layer "IC_N1_L01_P040" (solid, remove dead copper, pour order 40): 1378.95,957.32 1378.95,591.67 ccw(c1410.83,591.67) 1410.83,559.79 1501.73,559.79 ccw(c1501.73,590.35) 1532.28,590.35 1532.28,759.05 ccw(c1491.54,758.64) 1491.95,799.38 1453.1,799.38 cw(c1453.09,821.76) 1430.71,821.77 1430.71,957.32
IC_P1 on Top Layer "IC_P1_L01_P039" (solid, remove dead copper, pour order 39): 1351.76,957.53 1351.76,591.88 cw(c1319.88,591.88) 1319.88,560 1228.98,560 cw(c1228.98,590.55) 1198.43,590.55 1198.43,759.25 cw(c1239.16,758.85) 1238.76,799.59 1277.61,799.59 ccw(c1277.62,821.97) 1300,821.98 1300,957.53
IA_N2 on Top Layer "IA_N2_L01_P038" (solid, remove dead copper, pour order 38): 1778.95,957.32 1778.95,591.67 ccw(c1810.83,591.67) 1810.83,559.79 1901.73,559.79 ccw(c1901.73,590.35) 1932.28,590.35 1932.28,759.05 ccw(c1891.54,758.64) 1891.95,799.38 1853.1,799.38 cw(c1853.09,821.76) 1830.71,821.77 1830.71,957.32
IA_P2 on Top Layer "IA_P2_L01_P037" (solid, remove dead copper, pour order 37): 1751.76,957.53 1751.76,591.88 cw(c1719.88,591.88) 1719.88,560 1628.98,560 cw(c1628.98,590.55) 1598.43,590.55 1598.43,759.25 cw(c1639.16,758.85) 1638.76,799.59 1677.61,799.59 ccw(c1677.62,821.97) 1700,821.98 1700,957.53
IB_N2 on Top Layer "IB_N2_L01_P036" (solid, remove dead copper, pour order 36): 2178.95,957.32 2178.95,591.67 ccw(c2210.83,591.67) 2210.83,559.79 2301.73,559.79 ccw(c2301.73,590.35) 2332.28,590.35 2332.28,759.05 ccw(c2291.54,758.64) 2291.95,799.38 2253.1,799.38 cw(c2253.09,821.76) 2230.71,821.77 2230.71,957.32
IB_P2 on Top Layer "IB_P2_L01_P035" (solid, remove dead copper, pour order 35): 2151.76,957.53 2151.76,591.88 cw(c2119.88,591.88) 2119.88,560 2028.98,560 cw(c2028.98,590.55) 1998.43,590.55 1998.43,759.25 cw(c2039.16,758.85) 2038.76,799.59 2077.61,799.59 ccw(c2077.62,821.97) 2100,821.98 2100,957.53
IC_N2 on Top Layer "IC_N2_L01_P034" (solid, remove dead copper, pour order 34): 2578.95,957.32 2578.95,591.67 ccw(c2610.83,591.67) 2610.83,559.79 2701.73,559.79 ccw(c2701.73,590.35) 2732.28,590.35 2732.28,759.05 ccw(c2691.54,758.64) 2691.95,799.38 2653.1,799.38 cw(c2653.09,821.76) 2630.71,821.77 2630.71,957.32
IC_P2 on Top Layer "IC_P2_L01_P033" (solid, remove dead copper, pour order 33): 2551.76,957.53 2551.76,591.88 cw(c2519.88,591.88) 2519.88,560 2428.98,560 cw(c2428.98,590.55) 2398.43,590.55 2398.43,759.25 cw(c2439.16,758.85) 2438.76,799.59 2477.61,799.59 ccw(c2477.62,821.97) 2500,821.98 2500,957.53
IA_N3 on Top Layer "IA_N3_L01_P032" (solid, remove dead copper, pour order 32): 2978.95,957.32 2978.95,591.67 ccw(c3010.83,591.67) 3010.83,559.79 3101.73,559.79 ccw(c3101.73,590.35) 3132.28,590.35 3132.28,759.05 ccw(c3091.54,758.64) 3091.95,799.38 3053.1,799.38 cw(c3053.09,821.76) 3030.71,821.77 3030.71,957.32
IA_P3 on Top Layer "IA_P3_L01_P031" (solid, remove dead copper, pour order 31): 2951.76,957.53 2951.76,591.88 cw(c2919.88,591.88) 2919.88,560 2828.98,560 cw(c2828.98,590.55) 2798.43,590.55 2798.43,759.25 cw(c2839.16,758.85) 2838.76,799.59 2877.61,799.59 ccw(c2877.62,821.97) 2900,821.98 2900,957.53
IB_N3 on Top Layer "IB_N3_L01_P030" (solid, remove dead copper, pour order 30): 3378.95,957.32 3378.95,591.67 ccw(c3410.83,591.67) 3410.83,559.79 3501.73,559.79 ccw(c3501.73,590.35) 3532.28,590.35 3532.28,759.05 ccw(c3491.54,758.64) 3491.95,799.38 3453.1,799.38 cw(c3453.09,821.76) 3430.71,821.77 3430.71,957.32
IB_P3 on Top Layer "IB_P3_L01_P029" (solid, remove dead copper, pour order 29): 3351.76,957.53 3351.76,591.88 cw(c3319.88,591.88) 3319.88,560 3228.98,560 cw(c3228.98,590.55) 3198.43,590.55 3198.43,759.25 cw(c3239.16,758.85) 3238.76,799.59 3277.61,799.59 ccw(c3277.62,821.97) 3300,821.98 3300,957.53
IC_N3 on Top Layer "IC_N3_L01_P028" (solid, remove dead copper, pour order 28): 3778.95,957.32 3778.95,591.67 ccw(c3810.83,591.67) 3810.83,559.79 3901.73,559.79 ccw(c3901.73,590.35) 3932.28,590.35 3932.28,759.05 ccw(c3891.54,758.64) 3891.95,799.38 3853.1,799.38 cw(c3853.09,821.76) 3830.71,821.77 3830.71,957.32
IC_P3 on Top Layer "IC_P3_L01_P008" (solid, remove dead copper, pour order 8): 3751.76,957.53 3751.76,591.88 cw(c3719.88,591.88) 3719.88,560 3628.98,560 cw(c3628.98,590.55) 3598.43,590.55 3598.43,759.25 cw(c3639.16,758.85) 3638.76,799.59 3677.61,799.59 ccw(c3677.62,821.97) 3700,821.98 3700,957.53
NGND on Top Layer "NGND_L01_P006" (solid, remove dead copper, pour order 6): 10.2,10.2 4320.51,10.2 4320.51,976.38 10.2,976.38
NGND on Top Layer "NGND_L01_P007" (solid, remove dead copper, pour order 7): 10.2,1023.62 10.2,2548.86 4320.51,2548.86 4320.51,1023.62

## Silkscreen, mask and mechanical layers (free items; w line width, h text height)
Top Overlay:
  drawing of 4004 lines, arcs and shapes, not listed
  text "BOARD NO." at 54.67,980.62 h60
  text "OFP_CIM_v1.5" at 4270.84,326 h55 r90
  text "1S" at 413.98,295.95 h100
  text "1S" at 816.35,295.95 h100
  text "1S" at 1215.73,295.95 h100
  text "1S" at 1613.92,295.95 h100
  text "1S" at 2016.28,295.95 h100
  text "1S" at 2415.73,295.95 h100
  text "1S" at 2813.92,295.95 h100
  text "1S" at 3216.35,295.95 h100
  text "1S" at 3615.67,295.95 h100
  text "1L" at 615.59,294.75 h100
  text "1L" at 1017.95,294.75 h100
  text "1L" at 1417.34,294.75 h100
  text "1L" at 1815.53,294.75 h100
  text "1L" at 2217.89,294.75 h100
  text "1L" at 2617.34,294.75 h100
  text "1L" at 3015.53,294.75 h100
  text "1L" at 3417.95,294.75 h100
  text "1L" at 3817.28,294.75 h100
Bottom Solder:
  rectangle: 25.14,770 4305.57,976.38
  lines w60: 465.35,196.85 465.35,590.55 ; 665.35,196.85 665.35,590.55 ; 865.35,196.85 865.35,590.55 ; 1065.35,196.85 1065.35,590.55 ; 1265.35,196.85 1265.35,590.55 ; 1465.35,196.85 1465.35,590.55 ; 1665.35,196.85 1665.35,590.55 ; 1865.35,196.85 1865.35,590.55 ; 2065.35,196.85 2065.35,590.55 ; 2265.35,196.85 2265.35,590.55 ; 2465.35,196.85 2465.35,590.55 ; 2665.35,196.85 2665.35,590.55 ; 2865.35,196.85 2865.35,590.55 ; 3065.35,196.85 3065.35,590.55 ; 3265.35,196.85 3265.35,590.55 ; 3465.35,196.85 3465.35,590.55 ; 3665.35,196.85 3665.35,590.55 ; 3865.35,196.85 3865.35,590.55
Board Outline:
  lines w5: 10.2,10.2 4320.51,10.2
  lines w7.5: 9.84,9.84 4320.87,9.84 4320.87,2549.21 9.84,2549.21 9.84,9.84
Fabrication:
  drawing of 295 lines, arcs and shapes, not listed
  text "Layer" at 5235.58,2500 h60
  text "Name" at 5645.49,2500 h60
  text "Material" at 6575.23,2500 h60
  text "Thickness" at 7435,2500 h60
  text "Constant" at 8084.84,2500 h60
  text "Board Layer Stack" at 8654.7,2500 h60
  text "Top Overlay" at 5645.49,2380 h60
  text "Top Solder" at 5645.49,2260 h60
  text "Solder Resist" at 6575.23,2260 h60
  text "0.010mm" at 7435,2260 h60
  text "3.5" at 8084.84,2260 h60
  text "1" at 5235.58,2140 h60
  text "Top Layer" at 5645.49,2140 h60
  text "0.035mm" at 7435,2140 h60
  text "Dielectric 2" at 5645.49,2020 h60
  text "PP-006" at 6575.23,2020 h60
  text "0.203mm" at 7435,2020 h60
  text "4.1" at 8084.84,2020 h60
  text "2" at 5235.58,1900 h60
  text "Layer 1" at 5645.49,1900 h60
  text "CF-004" at 6575.23,1900 h60
  text "0.035mm" at 7435,1900 h60
  text "Dielectric 1" at 5645.49,1780 h60
  text "FR-4" at 6575.23,1780 h60
  text "1.030mm" at 7435,1780 h60
  text "4.8" at 8084.84,1780 h60
  text "3" at 5235.58,1660 h60
  text "Layer 2" at 5645.49,1660 h60
  text "CF-004" at 6575.23,1660 h60
  text "0.035mm" at 7435,1660 h60
  text "Dielectric 3" at 5645.49,1540 h60
  text "PP-006" at 6575.23,1540 h60
  text "0.203mm" at 7435,1540 h60
  text "4.1" at 8084.84,1540 h60
  text "4" at 5235.58,1420 h60
  text "Bottom Layer" at 5645.49,1420 h60
  text "0.035mm" at 7435,1420 h60
  text "Bottom Solder" at 5645.49,1300 h60
  text "Solder Resist" at 6575.23,1300 h60
  text "0.010mm" at 7435,1300 h60
  text "3.5" at 8084.84,1300 h60
  text "Bottom Overlay" at 5645.49,1180 h60
  text "Total board thickness:" at 5235.58,1060 h60
  text "1.596mm" at 7435,1060 h60
Drill Drawing:
  circle w10: c71.87,3913.33 r33.33
  lines w10: 38.54,3580 71.87,3596.67 105.2,3580 88.54,3613.33 105.2,3646.67 71.87,3630 38.54,3646.67 55.2,3613.33 38.54,3580 ; 38.54,3796.67 105.2,3796.67 71.87,3730 38.54,3796.67 ; 38.54,4030 105.2,4030 105.2,4096.67 38.54,4096.67 38.54,4030 ; 38.54,4196.67 55.2,4196.67 71.87,4180 88.54,4196.67 105.2,4196.67 88.54,4213.33 105.2,4230 88.54,4230 71.87,4246.67 55.2,4230 38.54,4230 55.2,4213.33 38.54,4196.67
  lines w15: -21.26,3535 7598.65,3535 ; -21.26,4285 7598.65,4285 ; 529.62,3385 529.62,4435 ; 1129.46,3385 1129.46,4435 ; 2279.12,3385 2279.12,4435 ; 2785,3385 2785,4435 ; 3518.8,3385 3518.8,4435 ; 5018.35,3385 5018.35,4435 ; 5608.2,3385 5608.2,4435 ; 6354,3385 6354,4435 ; -21.26,3385 7598.65,3385 7598.65,4435 -21.26,4435 -21.26,3385
  text "Symbol" at 68.74,4330 h72
  text "Count" at 574.62,4330 h72
  text "Hole Size" at 1174.46,4330 h72
  text "Plated" at 2324.12,4330 h72
  text "Hole Type" at 2830,4330 h72
  text "Drill Layer Pair" at 3563.8,4330 h72
  text "Via/Pad" at 5063.35,4330 h72
  text "Pad Shape" at 5653.2,4330 h72
  text "Template" at 6399,4330 h72
  text "2" at 574.62,4180 h60
  text "137.79mil (3.500mm)" at 1174.46,4180 h60
  text "PTH" at 2324.12,4180 h60
  text "Round" at 2830,4180 h60
  text "Top Layer - Bottom Layer" at 3563.8,4180 h60
  text "Pad" at 5063.35,4180 h60
  text "Rounded" at 5653.2,4180 h60
  text "c450h350" at 6399,4180 h60
  text "18" at 574.62,4030 h60
  text "74.80mil (1.900mm)" at 1174.46,4030 h60
  text "PTH" at 2324.12,4030 h60
  text "Round" at 2830,4030 h60
  text "Top Layer - Bottom Layer" at 3563.8,4030 h60
  text "Pad" at 5063.35,4030 h60
  text "Rounded" at 5653.2,4030 h60
  text "c300h190m310mx310p0" at 6399,4030 h60
  text "24" at 574.62,3880 h60
  text "40.16mil (1.020mm)" at 1174.46,3880 h60
  text "PTH" at 2324.12,3880 h60
  text "Round" at 2830,3880 h60
  text "Top Layer - Bottom Layer" at 3563.8,3880 h60
  text "Pad" at 5063.35,3880 h60
  text "Rounded" at 5653.2,3880 h60
  text "c180h102" at 6399,3880 h60
  text "108" at 574.62,3730 h60
  text "27.56mil (0.700mm)" at 1174.46,3730 h60
  text "PTH" at 2324.12,3730 h60
  text "Round" at 2830,3730 h60
  text "Top Layer - Bottom Layer" at 3563.8,3730 h60
  text "Via" at 5063.35,3730 h60
  text "Rounded" at 5653.2,3730 h60
  text "v120h70m0mx0" at 6399,3730 h60
  text "272" at 574.62,3580 h60
  text "11.81mil (0.300mm)" at 1174.46,3580 h60
  text "PTH" at 2324.12,3580 h60
  text "Round" at 2830,3580 h60
  text "Top Layer - Bottom Layer" at 3563.8,3580 h60
  text "Via" at 5063.35,3580 h60
  text "Rounded" at 5653.2,3580 h60
  text "v60h30m0mx0" at 6399,3580 h60
  text "424 Total" at 574.62,3430 h60

## Dimensions
4320.87,2549.21 to 4320.51,10.2 on Dimension
9.84,2549.21 to 4320.87,2549.21 on Dimension